# Altium PCB CoproMKII.PcbDoc (part 2 of 2)
Units mil, origin at the board's own origin, x right, y up, seen from the top; angles counter-clockwise.
Board outline 4000 x 4000 mil, 4 copper layers (Top Layer, Middle 1 Layer, Middle 2 Layer, Bottom Layer), stack 23.8 mil thick; 129 components, 100 nets, 483 pads, 174 vias.
Unrouted connection lines stored in the file: 51.
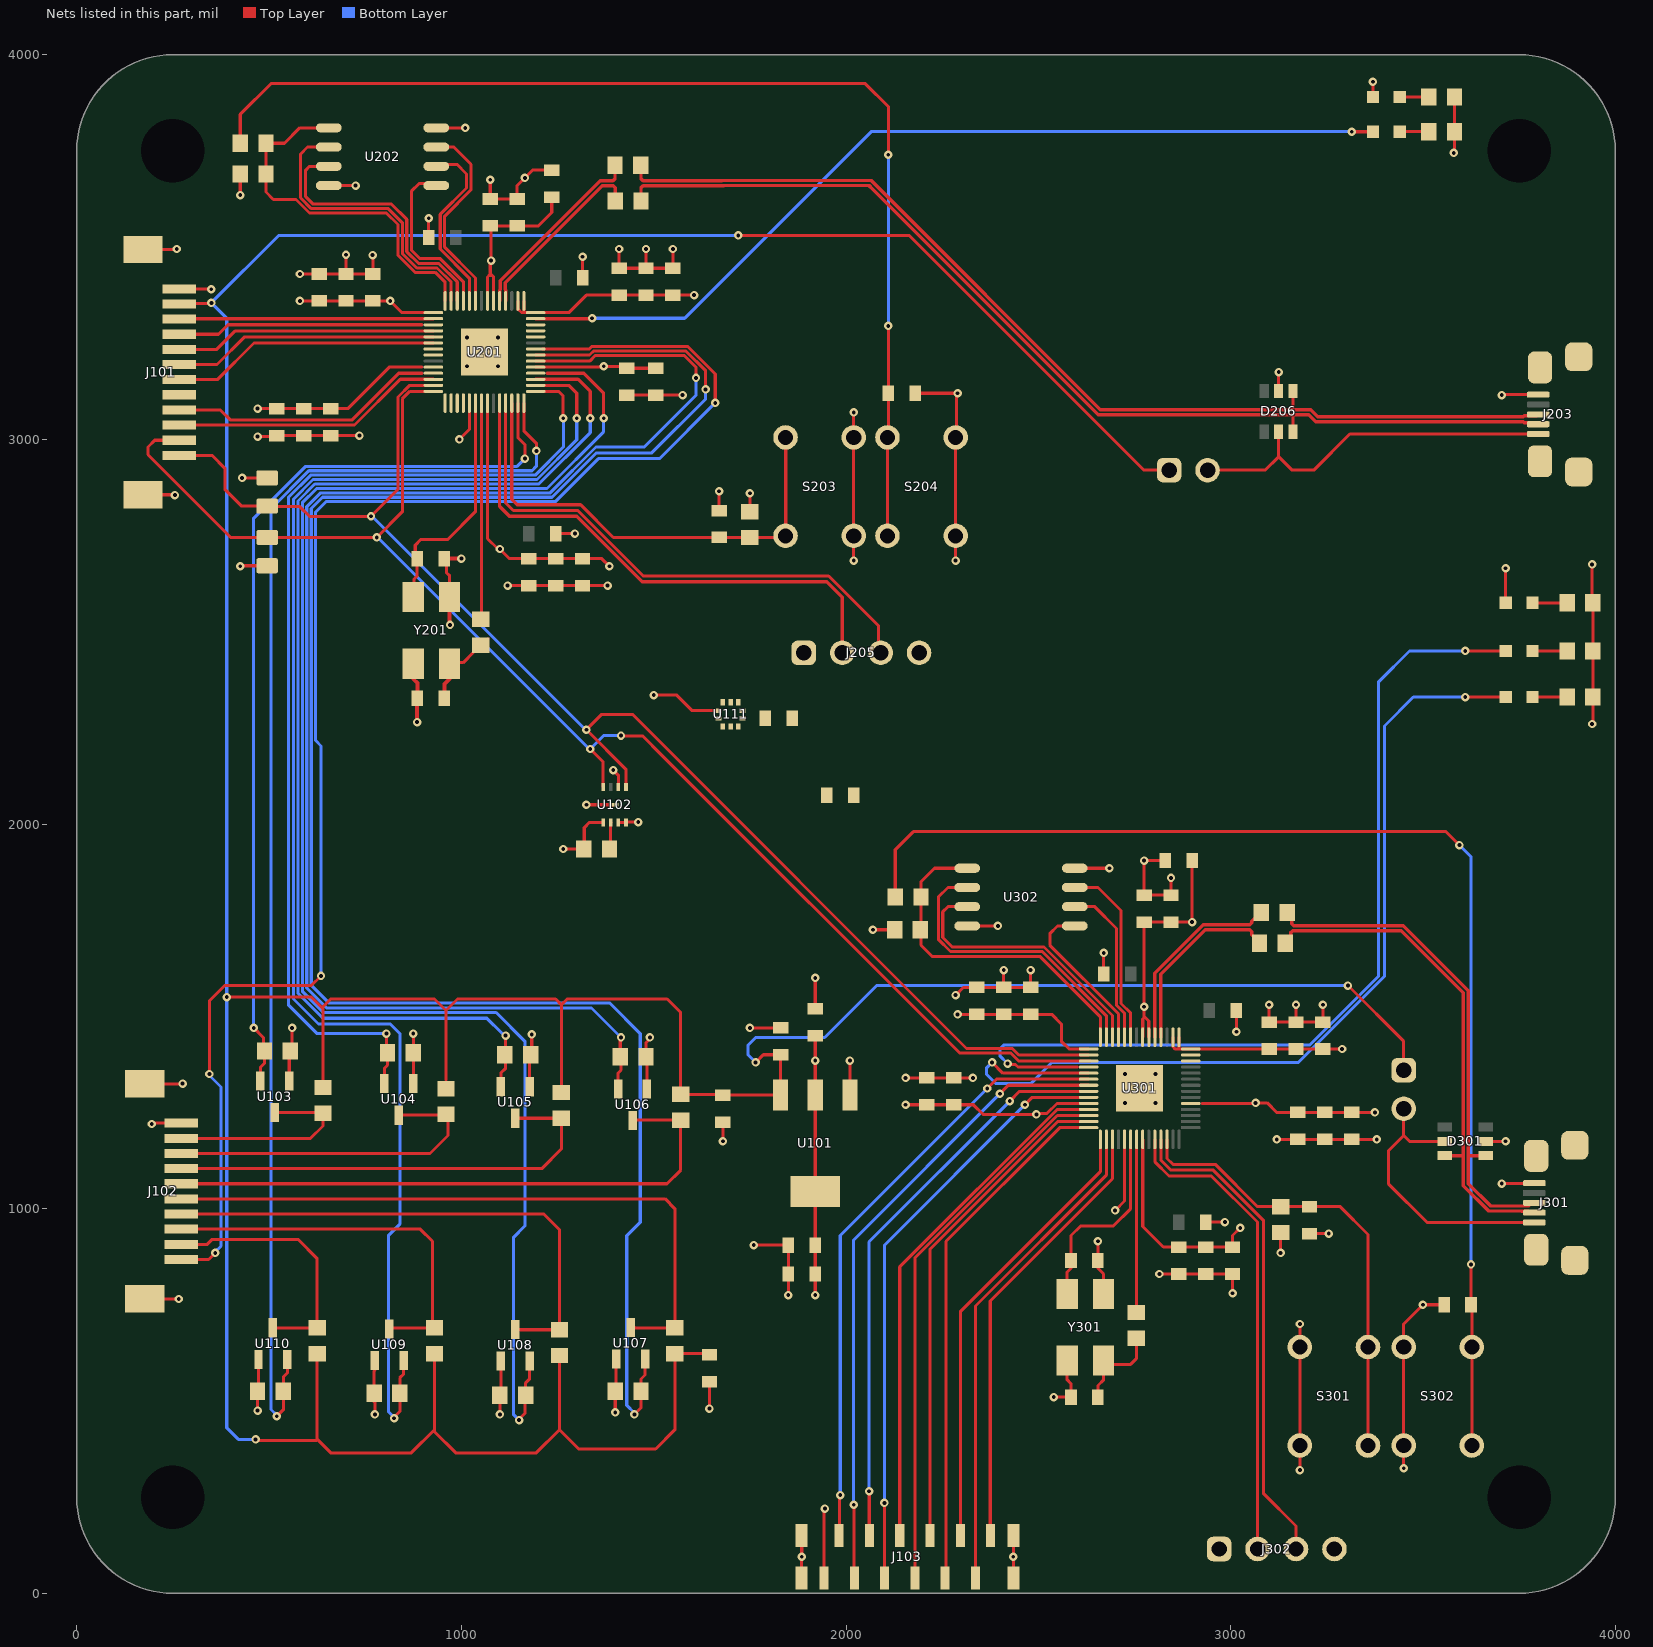
[diagram p4: the nets of this part, all layers, seen from the top]

## Via types
v1: diameter 22, hole 10, Top Layer to Bottom Layer, 174 vias

## Nets (pads, with @x,y where several pads share a name; then routed paths per layer and width w, separated by ;. In a path a pad name is that pad's centre, name@x,y a point inside that pad or via, vN(x,y) a via of type N, cw(c..) or ccw(c..) an arc to the next point about the centre after c; other vN are vias at no path point) (continued)
3V3_MCU: C104.1 C105.1 C106.1 C107.1 C108.1 C203.2 C204.2 C205.2 C206.2 C207.2 C208.2 C212.2 C213.2 C214.2 C215.2 C216.2 C217.2 C220.2 C221.1 C222.1 C233.1 C234.1 C301.2 C302.2 C303.2 C304.2 C305.2 C306.2 C307.2 C308.2 C309.2 C310.2 C311.2 C312.2 C313.2 C319.1 C320.1 C323.1 C324.1 D201.1 D304.1 J205.1 J302.1 R101.1 R102.1 R103.1 R105.1 R107.1 R109.1 R111.1 R113.1 R115.1 R117.1 R119.1 R205.1 R211.2 R307.2 R309.1 U101.2 U101.4 U102.5 U103.1 U104.1 U105.1 U106.1 U107.1 U108.1 U109.1 U110.1 U111.1 U111.6 U111.10 U201.1 U201.10 U201.22 U201.33 U201.42 U201.43 U201.44 U201.48 U201.49 U202.8 U301.1 U301.10 U301.22 U301.33 U301.42 U301.43 U301.44 U301.48 U301.49 U302.8 | length 8599.8
  Top Layer w8: v1(425,2670) 426.38,2671.38 R102.1@495,2671.38 ; v1(425,3635) R211.2@425,3690 ; v1(430,2900) R101.1@495,2900 ; R119.1@468,525 472.5,529.5 U110.1@472.5,608 ; v1(470,475) R119.1@470,525 ; v1(470,3080) C215.2@590,3080 704.49,3080 812.24,3187.76 897.78,3187.76 ; U103.1@552.5,1332 552.5,1407.5 560,1415 v1(560,1470) ; v1(580,3360) C214.2@700,3360 C205.2@770,3360 v1(815,3360) 845.51,3329.49 U201.1@927.24,3329.49 ; v1(775,465) 775,495.5 773,497.5 R117.1@773,520 773,578 775,580 U109.1@775,605 ; U104.1@875,1325 v1(875,1455) ; U202.8@934.76,3810 v1(1010,3810) ; U201.22@1067.99,3094.25 1067.99,2742.01 1095,2715 v1(1100,2715) 1125,2690 C206.2@1175,2690 C222.1@1300,2690 ; U201.49@1067.99,3360 1067.99,3421.99 1072.68,3426.68 1075,3426.68 ; v1@1075,3465 1075,3426.68 ; v1(1077.24,3465) 1077.24,3552.76 C212.2@1075,3555 C203.2@1145,3555 1200,3555 1235,3590 C234.1@1235,3630 ; U201.48@1083.74,3360 1083.74,3422.24 1079.31,3426.68 1075,3426.68 ; R115.1@1098,515 1102.5,519.5 U108.1@1102.5,604 ; v1(1100,465) R115.1@1100,515 ; U201.44@1146.73,3360 1146.73,3339.43 1156.4,3329.76 1162.48,3329.76 ; U201.43@1162.48,3360 1162.48,3329.76 ; U105.1@1177.5,1317 1177.5,1397.5 1182.89,1402.89 v1(1182.89,1452.82) ; U201.33@1192.99,3187.76 1367.76,3187.76 v1(1370,3190) 1425,3190 C208.2@1430,3185 C217.2@1505,3185 ; v1(1265,1935) R103.1@1318,1935 1319.37,1936.37 1319.37,1990.44 1333.11,2004.18 U102.5@1368.22,2004.18 ; C222.1@1315,2690 1365,2690 v1(1385,2670) ; v1(1400,470) R113.1@1400,525 ; U107.1@1402.5,609 1402.5,527.5 R113.1@1405,525 ; U106.1@1482.5,1311 1482.5,1392.5 R111.1@1480,1395 1480,1431.21 1490,1441.21 v1(1490,1445) ; v1(1500,2335) 1560,2335 1600.16,2294.84 U111.1@1668.33,2294.84 ; v1(1605,3375) C220.2@1550,3375 C213.2@1480,3375 1325,3375 1279.49,3329.49 U201.42@1192.99,3329.49 1162.21,3329.49 1162.48,3329.76 ; R205.1@1750,2812 v1(1750,2860) ; C105.1@1915,905 1920,910 U101.4@1920,1045 U101.2@1920,1295 v1(1920,1385) C106.1@1920,1450 ; v1(1920,775) C104.1@1920,830 C105.1@1920,905 ; v1(2070,1725) R307.2@2126.5,1725 ; v1(2155,1270) C304.2@2210,1270 C303.2@2280,1270 ; C303.2@2282.5,1272.5 2285,1270 2331.21,1270 2356.21,1245 v1(2495,1245) 2497.68,1247.68 2522.68,1247.68 2548.5,1273.5 U301.10@2630.75,1273.5 ; v1(2290,1505) C323.1@2340,1505 ; 2360,1505 C319.1@2410,1505 C320.1@2480,1505 2535,1505 2560,1480 2560,1435 2579.76,1415.24 U301.1@2630.75,1415.24 ; U302.8@2594.76,1885 v1(2685,1885) ; U301.22@2771.5,1180 2771.5,953.5 2825,900 C305.2@2865,900 C306.2@2935,900 C313.2@2985,900 ; U301.49@2771.5,1445.75 2771.5,1492.39 2775,1495.9 2775,1500 ; v1(2775,1525) 2775,1500 ; v1@2775,1529.86 C311.2@2775,1745 C324.1@2845,1745 v1(2900,1745) ; U301.48@2787.24,1445.75 2787.24,1487.76 2775,1500 ; U301.44@2850.24,1445.75 2850.24,1420 2854.92,1415.31 2865,1415.31 ; U301.43@2865.98,1445.75 2865.98,1415.24 U301.42@2896.5,1415.24 3099.76,1415.24 C307.2@3100,1415 C301.2@3170,1415 C312.2@3240,1415 v1(3290,1415) ; v1@2900,1750 C302.2@2900,1905 ; 2925.96,1273.57 3063.57,1273.57 v1(3065,1275) 3095,1275 3120,1250 C308.2@3175,1250 C309.2@3245,1250 C310.2@3295,1250 ; C313.2@3005,900 3005,930 v1(3025,950) ; v1(3130,885) R309.1@3130,938 ; C310.2@3315,1250 v1(3375,1250) ; D201.1@3370,3890 v1(3370,3930) ; D304.1@3715,2575 v1(3715,2665)
5V: C101.1 C102.1 C103.1 J101.2 J206.1 J303.1 R104.1 R106.1 R108.1 R110.1 R112.1 R114.1 R116.1 R118.1 U101.3 | length 12504.8
  Top Layer w8: J101.2@266.57,3352.17 267.99,3353.58 348.58,3353.58 v1(350,3355) ; v1(390,1550) 610,1550 640,1520 ; v1(465,400) 467.68,397.32 476.3,397.32 476.69,396.93 623.07,396.93 ; R118.1@625,623 625,400 660,365 870,365 930,425 ; R104.1@640,1332 640,1520 ; R116.1@930,623 930,425 ; 960,1335 960,1515 ; R114.1@1255,618 1255,425 ; R108.1@1260,1317 1260,1530 ; C102.1@1645,615 1637,623 R112.1@1555,623 1555,425 1505,375 1305,375 1255,425 ; v1(1719.82,3530.18) 2164.82,3530.18 2775,2920 J206.1@2840,2920 ; v1(1765,1380) 1785,1400 C103.1@1830,1400 1830,1335.91 1829.45,1335.35 U101.3@1829.45,1295 C101.1@1680,1295 1678,1297 R110.1@1570,1297 1570,1510 1535,1545 1275,1545 1260,1530 ; v1(3305,1580) 3450,1435 J303.1@3450,1365 ; J303.1@3445,1360 J303.1@3450,1360 ; 640,1520 640,1525 660,1545 930,1545 960,1515 ; 930,425 930,420 985,365 1195,365 1255,425 ; 960,1515 990,1545 1245,1545 1260,1530
  Bottom Layer w8: v1(465,400) 420,400 390,430 v1(390,1550) 390,3315 v1(350,3355) 525,3530 1719.64,3530 v1(1719.82,3530.18) ; v1(1765,1380) 1745,1400 1745,1425 1765,1445 1944.64,1445 2079.64,1580 v1(3305,1580)
5V_Reg_Cntrl: U201.8
12V_Reg_Cntrl: U201.7
A\c\t\u\a\t\o\r\_\U\S\B\_\B\O\O\T\: C321.1 R308.2 S302.1 S302.2 | length 3193.5
  Top Layer w8: R308.2@2128,1810 2128,1933 2175,1980 3560,1980 v1(3595,1945) ; v1(3625,855) C321.1@3625,750 3627.17,747.83 3627.17,645 3627.17,392.83 S302.2@3630,390
  Bottom Layer w8: v1(3595,1945) 3625,1915 v1(3625,855)
Actuator_QSPI_SCLK: U301.52 U302.6 | length 423.5
  Top Layer w8: U302.6@2594.76,1785 2647,1785 2703.5,1728.5 2703.5,1528.62 2724.25,1507.87 U301.52@2724.25,1445.75
Actuator_QSPI_SD0: U301.53 U302.5 | length 416.2
  Top Layer w8: U302.5@2594.76,1735 2550,1735 2530,1715 2530,1685 2708.5,1506.5 U301.53@2708.5,1445.75
Actuator_QSPI_SD1: U301.55 U302.2 | length 770.7
  Top Layer w8: U302.2@2315.24,1835 2265,1835 2240,1810 2240,1700 2271.5,1668.5 2510.24,1668.5 2677.01,1501.73 U301.55@2677.01,1445.75
Actuator_QSPI_SD2: U301.54 U302.3 | length 717.7
  Top Layer w8: U302.3@2315.24,1785 2265,1785 2251.5,1771.5 2251.5,1704.76 2276.26,1680 2515,1680 2692.76,1502.24 U301.54@2692.76,1445.75
Actuator_QSPI_SD3: U301.51 U302.7 | length 484.7
  Top Layer w8: U302.7@2594.76,1835 2655,1835 2715,1775 2715,1533.38 2740,1508.38 U301.51@2740,1445.75
Actuator_QSPI_SS: R307.1 R308.1 U301.56 U302.1 | length 896.1
  Top Layer w8: U302.1@2315.24,1885 2230,1885 2195,1850 R308.1@2195,1810 2195,1730 2195,1685 2225,1655 2505,1655 2661.26,1498.74 U301.56@2661.26,1445.75
Actuator_RUN: C322.1 R309.2 S301.1 S301.2 U301.26 | length 1216.4
  Top Layer w8: U301.26@2834.49,1180 2834.49,1130.51 2850,1115 2960,1115 3070,1005 R309.2@3130,1005 C322.1@3205,1005 3285,1005 3357.17,932.83 3357.17,807.83 ; 3357.17,807.17 S301.1@3357.17,642.83 ; S301.2@3360,375 3357.17,377.83 S301.2@3357.17,384.09 S301.1@3357.17,640 S301.1@3357.17,642.83 ; S301.1@3360,640 S301.1@3357.17,642.83
Actuator_SWCLK: J302.2 U301.24 | length 1234
  Top Layer w8: U301.24@2802.99,1180 2802.99,1122.01 2840,1085 2950,1085 3070,965 3070,145.09 3074.33,140.77 3074.33,128.97 J302.2@3070,124.65
Actuator_SWDIO: J302.3 U301.25 | length 1283.3
  Top Layer w8: U301.25@2818.74,1180 2818.74,1126.26 2845,1100 2955,1100 3085,970 3085,260 3170,175 J302.3@3170,106.64
Actuator_USB_N: D301.6 J301.2 R302.1 | length 1298.9
  Top Layer w9: R302.1@3142,1690 3155.76,1703.76 3155.76,1717.19 3161.04,1722.46 3443.81,1722.46 3605,1561.27 3605,1137.6 ; D301.6@3556.85,1137.6 3605,1137.6 ; J301.2@3775,992 3774.22,992.78 3756.45,992.78 3755.45,993.78 3670.83,993.78 3605,1059.62 3605,1137.6
Actuator_USB_P: D301.1 J301.3 R301.1 | length 1291.2
  Top Layer w9: R301.1@3147,1770 3158.69,1758.31 3158.69,1740.74 3163.96,1735.46 3449.19,1735.46 3618,1566.66 3618,1141.37 3621.77,1137.6 D301.1@3663.15,1137.6 ; 3618,1137.6 3618,1065 3676.22,1006.78 3775,1006.78
Actuator_USB_PIN_N: R302.2 U301.46 | length 488.1
  Top Layer w9: U301.46@2818.74,1445.75 2818.74,1609.29 2934.45,1725 3050,1725 3055,1720 3055,1712.5 3075,1692.5 R302.2@3075,1690
Actuator_USB_PIN_P: R301.2 U301.47 | length 507.8
  Top Layer w9: U301.47@2802.99,1445.75 2802.99,1611.93 2929.06,1738 3050,1738 3055,1743 3055,1747.5 3075,1767.5 R301.2@3075,1770
Actuator_USB_VCC: D301.5 J301.1 J303.2 | length 746.2
  Top Layer w8: J303.2@3450,1260 3450,1190 ; D301.5@3556.85,1175 3465,1175 3450,1190 ; J301.1@3789.69,963.82 3511.18,963.82 3410,1065 3410,1150 3450,1190
Actuator_XIN: C317.1 U301.20 Y301.1 | length 519.9
  Top Layer w8: Y301.1@2575,778.23 2575,835 2585,845 C317.1@2585,865 2585,930 2610,955 2695,955 2740,1000 U301.20@2740,1180
Actuator_XR: C318.1 R303.2 Y301.3 | length 249.6
  Top Layer w8: C318.1@2655,510 2655,540 2670,555 Y301.3@2670,604.49 ; Y301.3@2669.49,605 Y301.3@2670,604.49 ; R303.2@2755,663 2755,610 2740,595 2679.49,595 Y301.3@2670,604.49
Aux_LED: D302.1 U301.5 | length 2458.7
  Top Layer w8: v1(2380,1380) 2407.76,1352.24 U301.5@2630.75,1352.24 ; v1@3610,2325 3615,2330 D302.1@3715,2330
  Bottom Layer w8: v1(2380,1380) 2365,1365 2365,1350 2390,1325 2480,1325 2535,1380 3176.26,1380 3400,1603.74 3400,2255 3475,2330 v1(3610,2330)
AUX_SWITCH: J101.6 U201.5 | length 690.4
  Top Layer w8: J101.6@266.57,3194.69 364.68,3194.69 436.5,3266.5 U201.5@927.24,3266.5
C\o\p\r\o\_\U\S\B\_\B\O\O\T\: C246.1 R201.2 S204.1 S204.2 | length 2924.1
  Top Layer w8: R201.2@425,3770 425,3845 505,3925 2050.45,3925 2110,3865.45 v1(2110,3740) ; S204.2@2107.83,2995 2107.83,2747.17 S204.1@2110,2745 ; S204.2@2110,3010 C246.1@2110,3120 v1(2110,3295)
  Bottom Layer w8: v1(2110,3295) v1(2110,3740)
CAM_PWM: J103.2 U301.6 | length 1595.3
  Top Layer w8: J103.2@1982.24,150 1983.62,151.38 1983.62,253.62 v1(1985,255) ; v1(2367.32,1312.32) 2391.5,1336.5 U301.6@2630.75,1336.5
  Bottom Layer w8: v1(1985,255) 1985,930 v1(2367.32,1312.32)
CLAW1: J103.3 U301.7 | length 1656.8
  Top Layer w8: v1(2020,230) 2020.81,229.19 2020.81,40.57 J103.3@2021.61,39.76 ; v1(2400,1298.5) 2422.24,1320.75 U301.7@2630.75,1320.75
  Bottom Layer w8: v1(2020,230) 2020,918.5 v1(2400,1298.5)
CLAW2: J103.4 U301.8 | length 1481.2
  Top Layer w8: v1(2060,265) 2060.49,264.51 2060.49,150.49 J103.4@2060.98,150 ; v1(2425.72,1279.47) 2451.25,1305 U301.8@2615,1305
  Bottom Layer w8: v1(2060,265) 2060,913.75 v1(2425.72,1279.47)
Claw_Current: U301.41
Copro_LED_Fault: D202.1 U201.41 | length 2373.4
  Top Layer w8: U201.41@1192.99,3313.74 1338.74,3313.74 v1(1340,3315)
  Top Layer w9: v1(3315,3800) D202.1@3365,3800
  Bottom Layer w8: v1(1340,3315) 1580.36,3315 2065.36,3800 v1(3315,3800)
Copro_QSPI_SCLK: U201.52 U202.6 | length 478.8
  Top Layer w8: U202.6@934.76,3715 988.5,3715 1013.5,3690 1013.5,3653.5 945,3585 945,3495 1020.75,3419.25 U201.52@1020.75,3360
Copro_QSPI_SD0: U201.53 U202.5 | length 444.7
  Top Layer w8: U202.5@934.76,3665 890,3665 870,3645 870,3492.53 892.53,3470 945,3470 1005,3410 U201.53@1005,3360
Copro_QSPI_SD1: U201.55 U202.2 | length 773.2
  Top Layer w8: U202.2@655.24,3760 600,3760 581.5,3741.5 581.5,3628.5 610,3600 810,3600 846.5,3563.5 846.5,3483.5 884.18,3445.82 936.66,3445.82 973.5,3408.97 U201.55@973.5,3360
Copro_QSPI_SD2: U201.54 U202.3 | length 717.8
  Top Layer w8: U202.3@655.24,3710 605,3710 595,3700 595,3631.26 614.76,3611.5 818.5,3611.5 858,3572 858,3488.26 888.95,3457.32 941.42,3457.32 989.25,3409.48 U201.54@989.25,3360
Copro_QSPI_SD3: U201.51 U202.7 | length 525.5
  Top Layer w8: U202.7@934.76,3760 980.23,3760 1025,3715.23 1025,3648.74 956.5,3580.24 956.5,3499.76 1036.5,3419.77 U201.51@1036.5,3360
Copro_QSPI_SS: R201.1 R211.1 U201.56 U202.1 | length 964.9
  Top Layer w8: U202.1@655.24,3810 580,3810 540,3770 R201.1@492,3770 R211.1@492,3690 492,3643 511.26,3623.74 570,3623.74 605.24,3588.5 805,3588.5 835,3558.5 835,3478.74 879.42,3434.32 931.89,3434.32 957.76,3408.45 U201.56@957.76,3360
Copro_RUN: C245.1 R205.2 S203.1 S203.2 U201.26 | length 1256.2
  Top Layer w8: U201.26@1130.98,3094.25 1130.98,2844.02 1145,2830 1310,2830 1395,2745 C245.1@1670,2745 ; C245.1@1680,2740 1680.5,2740 1685.5,2745 R205.2@1750,2745 S203.1@1845,2745
  Top Layer w9: S203.1@1835,2740 S203.1@1840,2735 ; S203.1@1842.83,2749.09 1842.83,2997.83 S203.2@1845,3000
Copro_SWCLK: J205.2 U201.24 | length 1393.9
  Top Layer w8: 1099.49,2825.51 U201.24@1099.49,3094.25
  Top Layer w9: 1099.49,2825.51 1125,2800 1300,2800 1470,2630 1950,2630 1990,2590 1990,2460 J205.2@1985,2455
Copro_SWDIO: J205.3 U201.25 | length 1426.7
  Top Layer w8: U201.25@1115.24,3094.25 1115.24,2834.76 1135,2815 1302.68,2815 1472.68,2645 1955,2645 2085,2515 J205.3@2085,2450
Copro_USB_N: D206.6 J203.2 R203.1 | length 2668.8
  Top Layer w9: R203.1@1467,3620 1467,3654.53 1472.27,3659.81 1682.82,3659.81 ; 1683.12,3660.11 2059.89,3660.11 2070,3650 2655.62,3064.38 3162.2,3064.38 3202.71,3064.38 3221.38,3045.7 3760.86,3045.7 3763.78,3042.78 3796.31,3042.78 J203.2@3799.69,3039.41 ; D206.6@3162.2,3019.56 3162.2,3062.2
Copro_USB_P: D206.1 J203.3 R202.1 | length 2675.6
  Top Layer w9: R202.1@1466.45,3712.38 1467,3711.83 1467,3678.08 1472.27,3672.81 1677.43,3672.81 ; 1677.74,3673.11 2065.27,3673.11 2661,3077.38 3160,3077.38 ; D206.1@3162.2,3125.86 3162.2,3079.58 3160,3077.38 ; J203.3@3799.69,3065 3796.31,3061.63 3763.78,3061.63 3760.86,3058.7 3226.77,3058.7 3208.09,3077.38 3160,3077.38
Copro_USB_PIN_N: R203.2 U201.46 | length 474.8
  Top Layer w9: U201.46@1115.24,3360 1115.24,3388.4 1113.86,3389.78 1113.86,3406.96 1366.48,3659.58 1394.73,3659.58 1400,3654.31 R203.2@1400,3620
Copro_USB_PIN_P: R202.2 U201.47 | length 496
  Top Layer w9: U201.47@1099.49,3360 1099.49,3388.4 1100.86,3389.78 1100.86,3412.35 1361.09,3672.58 1394.18,3672.58 1399.45,3677.85 R202.2@1399.45,3712.38
Copro_USB_VCC: D206.5 J203.1 J206.2 | length 1006.8
  Top Layer w8: J206.2@2925,2920 3089.59,2920 3124.79,2955.21 D206.5@3124.79,3019.56 ; 3125,2955 3160,2920 3216.18,2920 3310,3013.82 J203.1@3799.69,3013.82
Copro_XIN: C223.1 U201.20 Y201.1 | length 614.2
  Top Layer w8: Y201.1@875,2590 876.68,2591.68 876.68,2636.68 885,2645 C223.1@885,2690 ; C223.1@880,2690 880,2725 895,2740 965,2740 1036.43,2811.43 1036.43,3094.19 U201.20@1036.5,3094.25
Copro_XR: C224.1 R204.2 Y201.3 | length 200.1
  Top Layer w8: Y201.3@969.49,2416.77 972.28,2419.56 1004.56,2419.56 1031.5,2446.5 R204.2@1031.5,2449 ; R204.2@1047.5,2465 R204.2@1050,2465 1052.5,2465 R204.2@1068.5,2481
  Top Layer w10: C224.1@955.68,2326.86 955.68,2363.59 969.49,2377.4 Y201.3@969.49,2416.77
ESC_TELEM: J102.10 U201.36 | length 4011.9
  Top Layer w8: J102.10@271.57,867.83 342.83,867.83 v1(360,885) ; v1(345,1350) 345,1540.36 384.64,1580 610,1580 v1(635,1605) ; U201.36@1210,3235 1332.47,3235 1338.97,3241.5 1588.5,3241.5 1660,3170 v1(1660,3095)
  Bottom Layer w8: v1(345,1350) 345,1346.21 375,1316.21 375,902.53 360,887.53 v1(360,885) ; v1(635,1605) 635,2203.03 621.13,2216.89 621.13,2811.13 648,2838 1244.26,2838 1356.26,2950 1515,2950 v1(1660,3095)
Ether_CLK_10: U201.17
Ether_MISO_12: U201.15
Ether_MOSI_11: U201.18
Ether_RST_9: U201.16
Fault_LED: D303.1 U301.4 | length 2423
  Top Layer w8: v1(2420,1377.24) 2422.68,1374.57 2440.43,1374.57 2447,1367.99 2601.28,1367.99 ; v1(3610,2450) D303.1@3715,2450
  Bottom Layer w8: v1(2420,1377.24) 2400,1397.24 2400,1415 2410,1425 3205,1425 3385,1605 3385,2370 3465,2450 v1(3610,2450)
GND: C101.2 C102.2 C103.2 C104.2 C105.2 C106.2 C107.2 C108.2 C203.1 C204.1 C205.1 C206.1 C207.1 C208.1 C210.1 C211.1 C212.1 C213.1 C214.1 C215.1 C216.1 C217.1 C219.1 C220.1 C221.2 C222.2 C223.2 C224.2 C233.2 C234.2 C245.2 C246.2 C301.1 C302.1 C303.1 C304.1 C305.1 C306.1 C307.1 C308.1 C309.1 C310.1 C311.1 C312.1 C313.1 C314.1 C315.1 C316.1 C317.2 C318.2 C319.2 C320.2 C321.2 C322.2 C323.2 C324.2 D206.2 D301.2 J101.1 J101.MP1 J101.MP2 J102.1 J102.MP1 J102.MP2 J103.1 J103.MP1 J103.MP2 J103.MP3 J103.MP4 J203.5 J203.6 J203.7 J203.8 J203.9 J205.4 J301.5 J301.6 J301.7 J301.8 J301.9 J302.4 R206.1 R207.1 R304.1 R305.1 R306.1 S203.3 S203.4 S204.3 S204.4 S301.3 S301.4 S302.3 S302.4 U101.1 U102.2 U102.7 U102.8 U102.9 U111.3 U111.5 U111.7 U111.8 U111.9 U201.19 U201.57 U202.4 U301.19 U301.57 U302.4 Y201.2 Y201.4 Y301.2 Y301.4 | length 8875.4
  Top Layer w8: J101.MP2@172.09,2856.1 253.9,2856.1 v1(255,2855) ; J101.MP1@172.09,3493.9 258.9,3493.9 v1(260,3495) ; J102.MP2@177.09,765.47 264.53,765.47 v1(265,765) ; J102.MP1@177.09,1324.53 274.53,1324.53 v1(275,1325) ; v1(195,1220) 197.17,1222.17 J102.1@271.57,1222.17 ; J101.1@266.57,3391.54 348.46,3391.54 v1(349.82,3390.18) ; v1(470,3007.2) 517.2,3007.2 C207.1@520,3010 C215.1@590,3010 v1(735,3010) ; v1(580,3430) C214.1@700,3430 ; U202.4@655.24,3660 v1(725,3660) ; v1(700,3480) C214.1@700,3430 ; v1(769.19,3479.19) 770,3478.38 C205.1@770,3430 C214.1@700,3430 ; C210.1@915,3510 C210.1@915,3525 v1(915,3575) ; C223.2@950,2690 961,2679 961,2654 969.49,2645.51 Y201.4@969.49,2590 ; v1(995,3000) 1020.75,3025.75 U201.19@1020.75,3094.25 ; v1(1075,3675) C212.1@1075,3625 C203.1@1145,3625 1145,3660 1185,3700 C234.2@1235,3700 ; v1@1115,2620 v1(1120,2620) C206.1@1175,2620 C216.1@1245,2620 C222.2@1300,2620 ; C211.1@1245,2755 v1(1295,2755) ; C222.2@1315,2620 v1(1380,2620) ; C219.1@1315,3420 v1(1315,3475) ; v1(1325,2050) U102.9@1398.19,2050 ; v1@1390.58,2144.42 v1(1395,2140) 1408.03,2126.97 U102.2@1408.03,2096.26 ; U102.7@1408.47,2004.18 1427.27,2004.18 U102.8@1427.72,2003.74 ; v1(1410,3495) C204.1@1410,3445 C213.1@1480,3445 ; U102.8@1427.72,2004.81 1459.81,2004.81 v1(1460,2005) ; C208.1@1430,3115 C217.1@1500,3115 ; v1(1480,3495) C213.1@1480,3445 ; C217.1@1505,3115 v1(1575,3115) ; v1(1550,3495) C220.1@1550,3445 C213.1@1480,3445 ; v1(1645,480) C102.2@1645,550 ; C245.2@1670,2810 v1(1670,2865) ; v1(1680,1175) C101.2@1680,1225 ; v1(1750,1470) C103.2@1830,1470 ; v1(1760,905) C105.2@1850,905 C104.2@1850,830 v1(1850,775) ; J103.MP1@1883.82,39.76 1883.82,93.82 v1(1885,95) 1885,148.82 J103.MP2@1883.82,150 ; C106.2@1920,1520 v1(1920,1600) ; J103.1@1942.87,39.76 1942.87,217.87 v1(1945,220) ; v1(2010,1385) 2010.55,1384.45 U101.1@2010.55,1295 ; v1(2020,2685) S203.3@2020,2749.09 v1(2020,3070) ; v1(2155,1340) C304.1@2210,1340 C303.1@2280,1340 v1(2330,1340) v1@2335,1340 ; C246.2@2180,3120 v1(2290,3120) 2287.5,3117.5 2287.5,3002.5 S204.4@2290,3000 ; v1(2285,1555) 2305,1575 C319.2@2410,1575 ; v1(2285,2685) S204.3@2285,2739.09 ; S204.3@2285,2745 S204.4@2285,2995 ; U302.4@2315.24,1735 v1(2395,1735) ; v1(2410,1620) C319.2@2410,1575 ; J103.MP4@2435,39.76 v1(2435,95) J103.MP3@2435,150 ; v1(2480,1620) C320.2@2480,1575 C319.2@2410,1575 ; v1(2540,510) C318.2@2585,510 2585,545 2575,555 Y301.2@2575,605 ; v1(2655,915) C317.2@2655,865 2655,845 2669.49,830.51 Y301.4@2669.49,778.23 ; C315.1@2670,1610 v1(2670,1665) ; v1(2699.82,995.18) 2724.25,1019.61 U301.19@2724.25,1180 ; v1(2815,830) C305.1@2865,830 C306.1@2935,830 C313.1@2990,830 ; C302.1@2830,1905 v1(2775,1905) C311.1@2775,1815 C324.2@2845,1815 v1(2845,1860) ; C314.1@2935,965 v1(2985,965) ; v1(3005,780) C313.1@3005,830 ; v1(3015,1460) C316.1@3015,1515 ; v1(3100,1530) C307.1@3100,1485 C301.1@3170,1485 ; v1(3120,1180) C309.1@3245,1180 C310.1@3295,1180 ; D206.2@3125,3123.15 v1(3125,3175) ; v1(3170,1530) C301.1@3170,1485 ; v1(3180,320) S301.4@3180,384.09 ; v1(3180,700) 3180,395 S301.4@3185,390 ; C322.2@3205,935 v1(3255,935) ; v1(3240,1530) C312.1@3240,1485 C301.1@3170,1485 ; C310.1@3315,1180 v1(3380,1180) ; v1(3450,325) S302.4@3450,389.09 ; S302.4@3450,395 3450,700 3495.43,745.43 3495.43,749.57 v1@3495,750 ; v1(3500,750) C321.2@3555,750 C321.2@3560,750 ; v1(3580,3745) 3582,3747 R207.1@3582,3800 R206.1@3582,3890 ; D301.2@3663.15,1175 v1(3715,1175) ; v1(3705,1065) 3705.59,1065.59 3789.09,1065.59 J301.5@3789.69,1066.18 ; v1(3705,3115) 3706.18,3116.18 J203.5@3799.69,3116.18 ; v1(3940,2260) 3942,2262 R304.1@3942,2330 R305.1@3942,2450 R306.1@3942,2575 3940,2577 v1(3940,2675)
  Top Layer w10: Y201.2@875,2428.58 Y201.2@875,2416.77 875,2377.4 885.68,2366.72 C224.2@885.68,2326.86 885,2326.18 v1(885,2265) ; C223.2@950,2690 v1(1000,2690) ; Y201.4@969.49,2590 969.49,2518.4 v1(970.36,2517.52)
  other v1: 2725,1275 2805,1275 2725,1350 2805,1350 1015,3190 1095,3190 1015,3265 1095,3265 1165,3680
KILL_SWITCH: J101.5 U201.4 | length 680.6
  Top Layer w8: J101.5@266.57,3234.06 364.06,3234.06 412.24,3282.24 U201.4@927.24,3282.24
LIGHTING_1: J101.9 U201.11 | length 692.7
  Top Layer w8: J101.9@266.57,3076.57 373.43,3076.57 400,3050 715,3050 836.94,3171.94 897.78,3171.94
LIGHTING_2: J101.10 U201.12 | length 710
  Top Layer w8: J101.10@266.57,3037.2 722.2,3037.2 841.26,3156.26 U201.12@927.24,3156.26
MARKER1: J103.5 U301.9 | length 1555.3
  Top Layer w8: v1(2100,235) 2100.18,234.82 2100.18,39.94 J103.5@2100.35,39.76 ; v1(2465,1270) 2484.25,1289.25 U301.9@2630.75,1289.25
  Bottom Layer w8: v1(2100,235) 2100,905 v1(2465,1270)
MARKER2: J103.6 U301.11 | length 1365.5
  Top Layer w8: J103.6@2139.72,150 2139.72,848.46 2549.02,1257.76 U301.11@2630.75,1257.76 U301.11@2637.24,1257.76
NetD201_2: D201.2 R206.2 | length 75
  Top Layer w8: D201.2@3440,3890 R206.2@3515,3890
NetD202_2: D202.2 R207.2 | length 75
  Top Layer w8: D202.2@3440,3800 R207.2@3515,3800
NetD302_2: D302.2 R304.2 | length 90
  Top Layer w8: D302.2@3785,2330 R304.2@3875,2330
NetD303_2: D303.2 R305.2 | length 90
  Top Layer w8: D303.2@3785,2450 R305.2@3875,2450
NetD304_2: D304.2 R306.2 | length 90
  Top Layer w8: D304.2@3785,2575 R306.2@3875,2575
NetR103_2: R103.2 U102.6 | length 70.1
  Top Layer w8: R103.2@1385,1935 1387.72,1937.72 1387.72,2003.11 U102.6@1388.35,2003.74
NetR204_1: R204.1 U201.21 | length 563.2
  Top Layer w8: R204.1@1050,2532 1052.18,2534.18 1052.18,3094.19 U201.21@1052.24,3094.25
NetR303_1: R303.1 U301.21 | length 456.3
  Top Layer w8: R303.1@2750.75,734.25 R303.1@2755,730 2755.75,730.75 U301.21@2755.75,1180
PORT_BATT_DIS: J101.7
PWM1: J102.2 R104.2 U103.3 | length 519.8
  Top Layer w8: J102.2@271.57,1182.8 607.8,1182.8 640,1215 R104.2@640,1243 ; U103.3@515,1250 R104.2@625,1250
PWM2: J102.3 R106.2 U104.3 | length 893.1
  Top Layer w8: J102.3@271.57,1143.43 918.43,1143.43 965,1190 965,1240 R106.2@960,1245 958,1243 U104.3@837.5,1243
PWM3: J102.4 R108.2 U105.3 | length 1209.5
  Top Layer w8: J102.4@271.57,1104.06 1209.06,1104.06 1260,1155 R108.2@1260,1235 U105.3@1140,1235
PWM4: J102.5 R110.2 U106.3 | length 1568.5
  Top Layer w8: J102.5@271.57,1064.69 1534.69,1064.69 1570,1100 R110.2@1570,1230 1446,1230 U106.3@1445,1229
PWM5: J102.6 R112.2 U107.3 | length 1719.3
  Top Layer w8: J102.6@271.57,1025.32 1529.68,1025.32 1555,1000 R112.2@1555,690 1452,690 1451,691 U107.3@1440,691
PWM6: J102.7 R114.2 U108.3 | length 1375.8
  Top Layer w8: J102.7@271.57,985.94 1214.06,985.94 1255,945 R114.2@1255,685 1152,685 1151,686 U108.3@1140,686
PWM7: J102.8 R116.2 U109.3 | length 1012.3
  Top Layer w8: J102.8@271.57,946.57 893.43,946.57 925,915 925,695 R116.2@930,690 815.5,690 U109.3@812.5,687
PWM8: J102.9 R118.2 U110.3 | length 674.4
  Top Layer w8: J102.9@271.57,907.2 339.22,907.2 352.02,920 575,920 625,870 R118.2@625,690 U110.3@510,690
PWM_3V3_1: R105.2 U103.2 U201.27 | length 2400
  Top Layer w8: v1(460,1470) 485,1445 485,1413 R105.2@488,1410 488,1378 477.5,1367.5 U103.2@477.5,1332 ; U201.27@1146.73,3094.25 1146.73,3004.8 1165,2986.54 v1(1165,2950)
  Bottom Layer w8: v1(460,1470) 460,2795 595,2930 1145,2930 v1(1165,2950)
PWM_3V3_2: R107.2 U104.2 U201.29 | length 2718.3
  Top Layer w8: U104.2@800,1325 800,1365 808,1373 R107.2@808,1405 805,1408 v1(805,1455) ; U201.29@1192.99,3124.76 1252.68,3124.76 1264.44,3113 1264.44,3055.56 v1(1265,3055)
  Bottom Layer w8: v1(805,1455) 625,1455 550,1530 550,2848.74 608.26,2907 1192,2907 1265,2980 v1(1265,3055)
PWM_3V3_3: R109.2 U105.2 U201.31 | length 3097.1
  Top Layer w8: U105.2@1102.5,1317 1102.5,1352.5 1115,1365 1115,1398 R109.2@1113,1400 1115,1402 v1(1115,1450) ; U201.31@1192.99,3156.26 1303.74,3156.26 1335,3125 v1(1335,3055)
  Bottom Layer w8: v1@1110,1450 1110,1451.21 1104.84,1456.37 1066.21,1495 640,1495 575,1560 575,2840 619,2884 1201.53,2884 1335,3017.47 v1(1335,3055)
PWM_3V3_4: R111.2 U106.2 U201.34 | length 3901.4
  Top Layer w8: U201.34@1192.99,3203.5 1333.5,3203.5 1348.5,3218.5 1578.97,3218.5 1609.47,3188 1609.47,3160.53 v1(1610,3160) ; U106.2@1407.5,1311 1407.5,1352.5 1415,1360 1415,1393 R111.2@1413,1395 1413,1443 v1(1415,1445)
  Bottom Layer w8: v1(1415,1445) 1338.5,1521.5 650,1521.5 598,1573.5 598,2825 634,2861 1231,2861 1350,2980 1475.36,2980 1610,3114.64 v1(1610,3160)
PWM_3V3_5: R113.2 U107.2 U201.35 | length 5000.2
  Top Layer w8: U201.35@1192.99,3219.25 1332.99,3219.25 1343.74,3230 1583.74,3230 1635,3178.74 v1(1635,3130) ; v1(1450,465) 1467,482 R113.2@1467,525 1467,557 1477.5,567.5 U107.2@1477.5,609
  Bottom Layer w8: v1(1450,465) 1450,468.79 1430,488.79 1430,929.39 1465,964.39 1465,1455 1385,1535 655,1535 609.63,1580.37 609.63,2820.37 638.76,2849.5 1235.76,2849.5 1351.26,2965 1495,2965 1635,3105 v1(1635,3130)
PWM_3V3_6: R115.2 U108.2 U201.32 | length 4201.1
  Top Layer w8: v1(1150,450) 1150,452.53 1165,467.53 1165,513 R115.2@1167,515 1167,547 1177.5,557.5 U108.2@1177.5,604 ; 1222.46,3171.94 1318.06,3171.94 1370,3120 v1(1370,3055)
  Bottom Layer w8: v1(1150,450) 1135,465 1135,924.57 1165,954.57 1165,1435.36 1090.36,1510 641.26,1510 591.19,1560.08 586.5,1564.76 586.5,2835.24 623.76,2872.5 1222.5,2872.5 1370,3020 v1(1370,3055)
PWM_3V3_7: R117.2 U109.2 U201.30 | length 3829.8
  Top Layer w8: v1(825,455) 825,457.53 840,472.53 R117.2@840,520 840,560 850,570 U109.2@850,605 ; U201.30@1192.99,3140.51 1279.49,3140.51 1300,3120 v1(1300,3055)
  Bottom Layer w8: v1(825,455) 825,457.53 810,472.53 810,929.57 840,959.57 840,1455.36 815.36,1480 628.42,1480 563.5,1544.92 563.5,2844.76 614.24,2895.5 1196.76,2895.5 1300,2998.74 v1(1300,3055)
PWM_3V3_8: R119.2 U110.2 U201.28 | length 3438.9
  Top Layer w8: v1(520,460) 537,477 R119.2@537,525 537,562 547.5,572.5 U110.2@547.5,608 ; U201.28@1162.48,3094.25 1162.48,3022.52 1195,2990 v1(1195,2970)
  Bottom Layer w8: v1(520,460) 520,462.53 505,477.53 505,2820 603.5,2918.5 1183.5,2918.5 1195,2930 v1(1195,2970)
PWR_KILL: U201.6 | length 700.2
  Top Layer w8: 266.57,3155.31 365.31,3155.31 460.75,3250.75 U201.6@927.24,3250.75
PWR_MOBO: J101.4 U201.3 | length 641.4
  Top Layer w8: J101.4@266.57,3273.43 368.43,3273.43 393.06,3298.06 897.78,3298.06
PWR_PLTR: J101.3 U201.2 | length 661.1
  Top Layer w8: J101.3@266.57,3312.8 267.52,3313.74 U201.2@927.24,3313.74
RGB1: U201.38
RGB2: U201.39
RGB3: U201.40
SCL: J101.11 R102.2 U102.4 U111.2 U201.14 U301.3 | length 3830.2
  Top Layer w8: J101.11@266.57,2997.83 202.83,2997.83 185,2980 185,2960.36 400.36,2745 R102.2@495,2745 v1(780,2745) 846.5,2811.5 846.5,3105.24 866.03,3124.76 U201.14@927.24,3124.76 ; v1(1335,2195) 1368.66,2161.34 U102.4@1368.66,2096.26 ; v1(1415,2230) 1415.76,2229.24 1470.76,2229.24 1520,2180 2295,1405 2427.6,1405 2448.86,1383.74 U301.3@2630.75,1383.74 U301.3@2635.24,1383.74
  Bottom Layer w8: v1(780,2745) 782.5,2745 1332.5,2195 v1(1335,2195) 1370,2230 v1(1415,2230)
SDA: J101.12 R101.2 U102.1 U111.4 U201.13 U301.2 | length 3710.7
  Top Layer w8: J101.12@266.57,2958.46 351.54,2958.46 385,2925 385,2870 428.62,2826.38 R101.2@495,2826.38 496.38,2825 580,2825 605,2800 v1(765,2800) 835,2870 835,3110 865.51,3140.51 U201.13@927.24,3140.51 ; U102.1@1427.72,2096.26 1427.72,2142.64 1325.36,2245 v1(1325,2245) 1365,2285 1445,2285 2313.5,1416.5 2432.36,1416.5 2449.37,1399.49 U301.2@2630.75,1399.49
  Bottom Layer w8: v1(765,2800) 767.5,2800 1322.5,2245 v1(1325,2245)
STAR_BATT_DIS: J101.8
TORP_ARM: J103.7 U301.12 | length 1436.9
  Top Layer w8: J103.7@2179.09,39.76 2179.09,871.57 2549.53,1242.01 U301.12@2630.75,1242.01
Torp_Charge: U301.40
TORP_COIL1: J103.10 U301.15 | length 1180.8
  Top Layer w8: J103.10@2297.2,150 2297.2,732.2 2661.26,1096.26 U301.15@2661.26,1180
TORP_COIL2: J103.11 U301.16 | length 1281.2
  Top Layer w8: J103.11@2336.57,39.76 2336.57,746.57 2677.01,1087.01 U301.16@2677.01,1180
TORP_COIL3: J103.12 U301.17 | length 1170.7
  Top Layer w8: J103.12@2375,140.94 2375,760 2692.76,1077.76 U301.17@2692.76,1180
TORP_SEL1: J103.8 U301.13 | length 1294.3
  Top Layer w8: J103.8@2218.46,150 2218.46,894.67 2550.05,1226.26 U301.13@2630.75,1226.26
TORP_SEL2: J103.9 U301.14 | length 1375.6
  Top Layer w8: J103.9@2260,32.58 2260,915 2555.51,1210.51 U301.14@2630.75,1210.51
pads on no net: D206.3 D206.4 D301.3 D301.4 J203.4 J301.4 U102.3 U201.9 U201.37 U301.18 U301.27 U301.28 U301.29 U301.30 U301.31 U301.32 U301.34 U301.35 U301.36 U301.37 U301.38 U301.39

## Polygon pours and split planes (outlines as drawn)
GND on Middle 1 Layer "GND_PLANE" (solid, pour order 0): 0,250 0,3750 cw(c250,3750) 250,4000 3750,4000 cw(c3750,3750) 4000,3750 4000,250 cw(c3750,250) 3750,0 250,0 cw(c250,250)
3V3_MCU on Middle 2 Layer "3V3_PLANE" (solid, pour order 1): 0,250 0,3750 cw(c250,3750) 250,4000 3750,4000 cw(c3750,3750) 4000,3750 4000,250 cw(c3750,250) 3750,0 250,0 cw(c250,250)

## Keep-outs
Keep-Out Layer:
  lines w10: 245,3995 3745,3995 ; 250,4000 ccw(c250,3750) 0,3750 0,250 ccw(c250,250) 250,0 3750,0 ccw(c3750,250) 4000,250 4000,3750 ccw(c3750,3750) 3750,4000

## Silkscreen, mask and mechanical layers (free items; w line width, h text height)
Top Overlay:
  drawing of 19 lines, arcs and shapes, not listed
  text "Power Con" at 117,3572 h30
  text "Copro USB" at 3677,3337 h30
  text "Copro Debug" at 1842,2577 h30
  text "Actuator USB" at 3632,1297 h30
  text "Thruster Con" at 422,1203 h30 r270
  text "Actuator Con" at 1972,342 h30
  text "Actuator Debug" at 3152,237 h30
  text "The Underwater Robotics Team" at 1485,235 h60
  text "'.ProjectTitle'" at 1485,129.99 h60

## Text inside footprints (layer, text, board x,y; h text height)
J101: Top Overlay "12" at 240.98,2930.91 h40 r270; Top Overlay "1" at 240.98,3434.84 h40 r270
J102: Top Overlay "1" at 245.98,1265.47 h40 r270; Top Overlay "10" at 245.98,840.28 h40 r270
J103: Top Overlay "12P" at 2466.5,173.62 h40
J205: Top Overlay "1" at 1820,2465 h30
J206: Top Overlay "1" at 2770,2940 h30
J302: Top Overlay "1" at 2900,135 h30
J303: Top Overlay "1" at 3470,1430 h30 r270